# Altium PCB PCB2.PcbDoc (part 1 of 2)
Units mil, origin at the board's own origin, x right, y up, seen from the top; angles counter-clockwise.
Board outline 3543.02 x 3779.37 mil, 2 copper layers (Top Layer, Bottom Layer), stack 62.206 mil thick; 106 components, 60 nets, 312 pads, 222 vias.
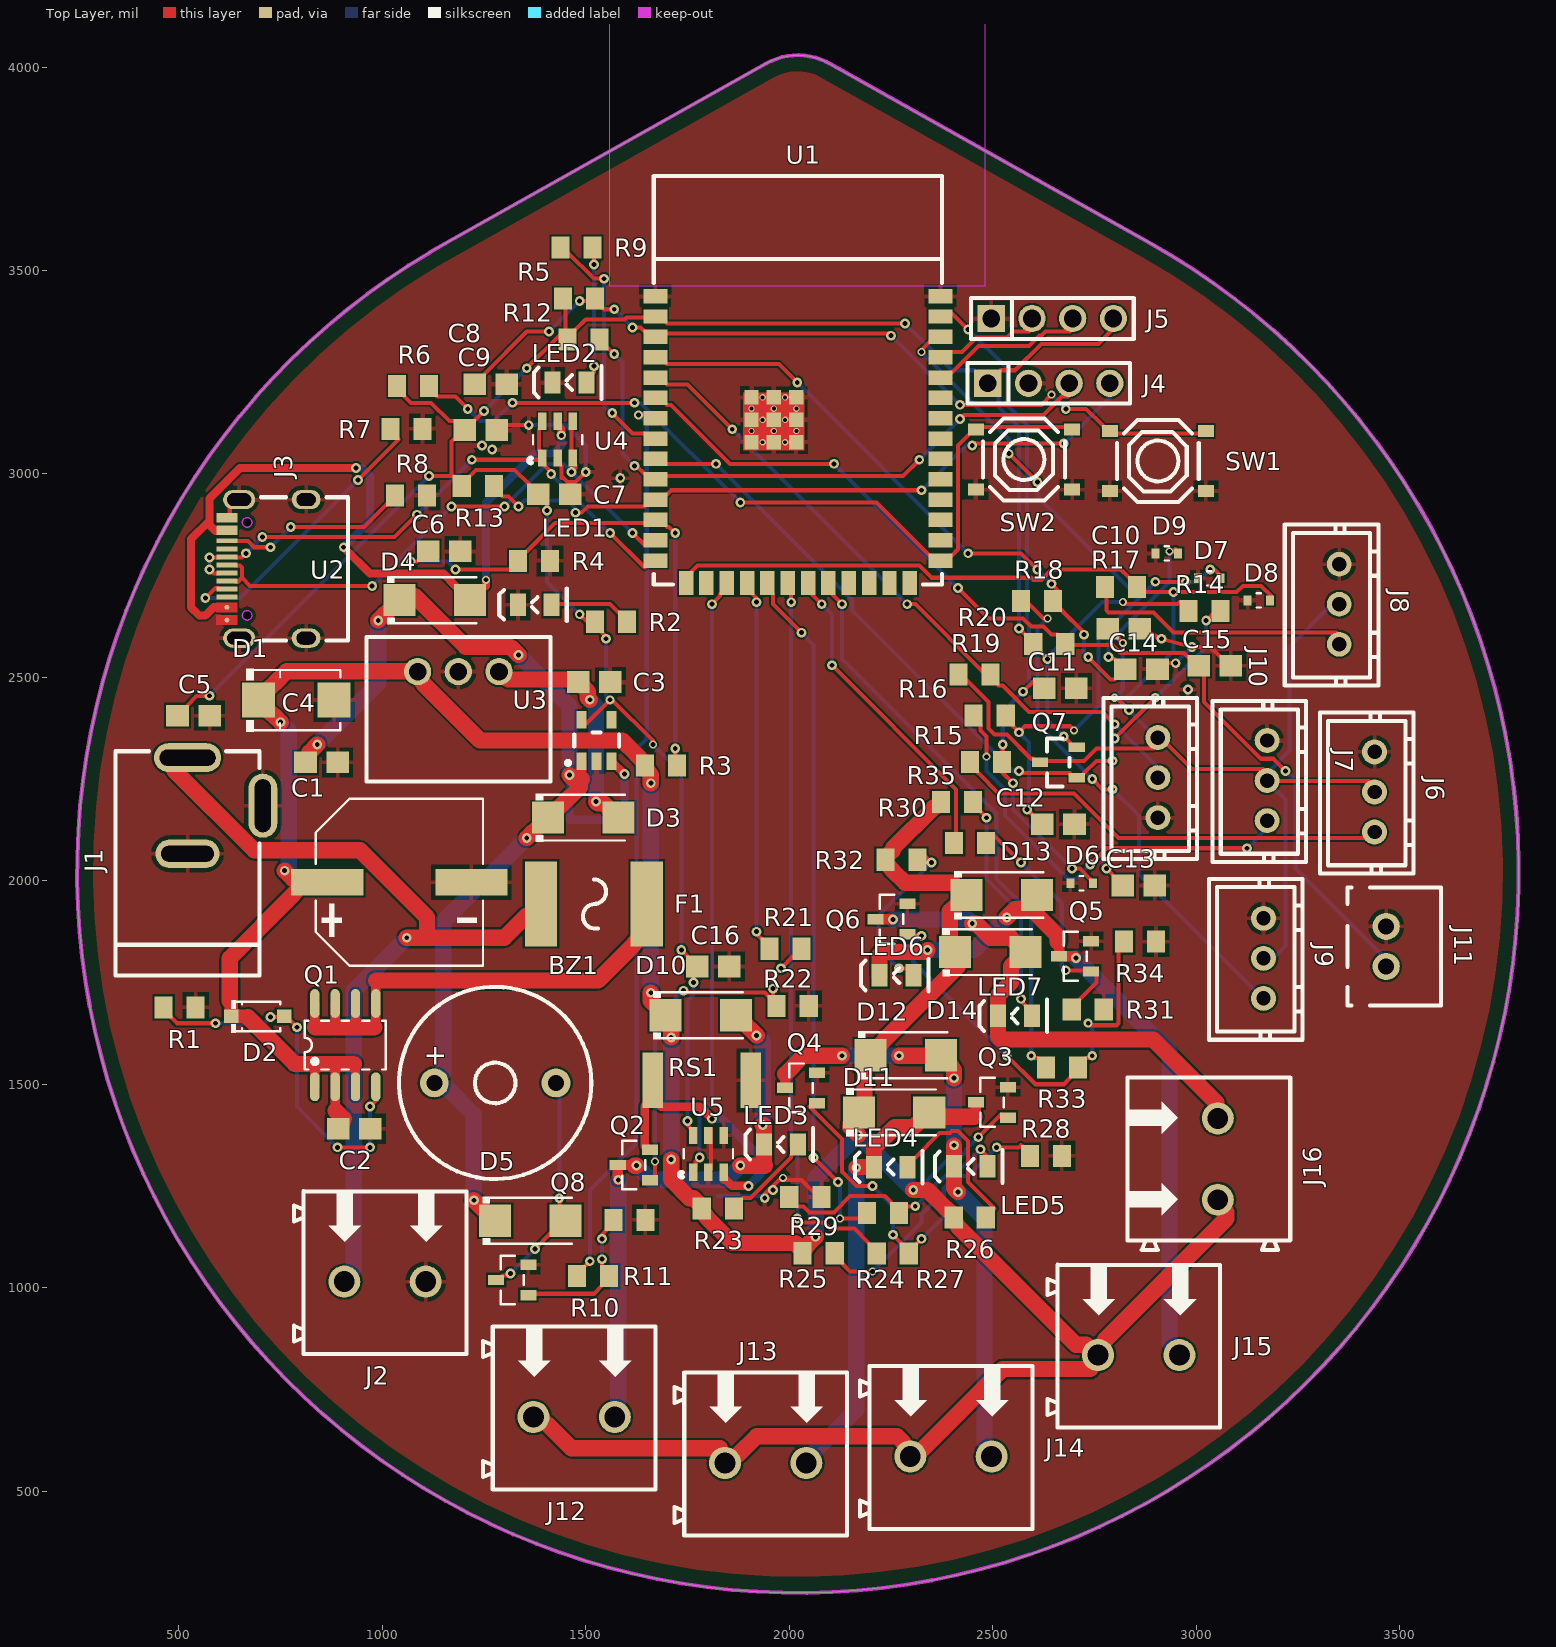
[diagram p0: Top Layer view]
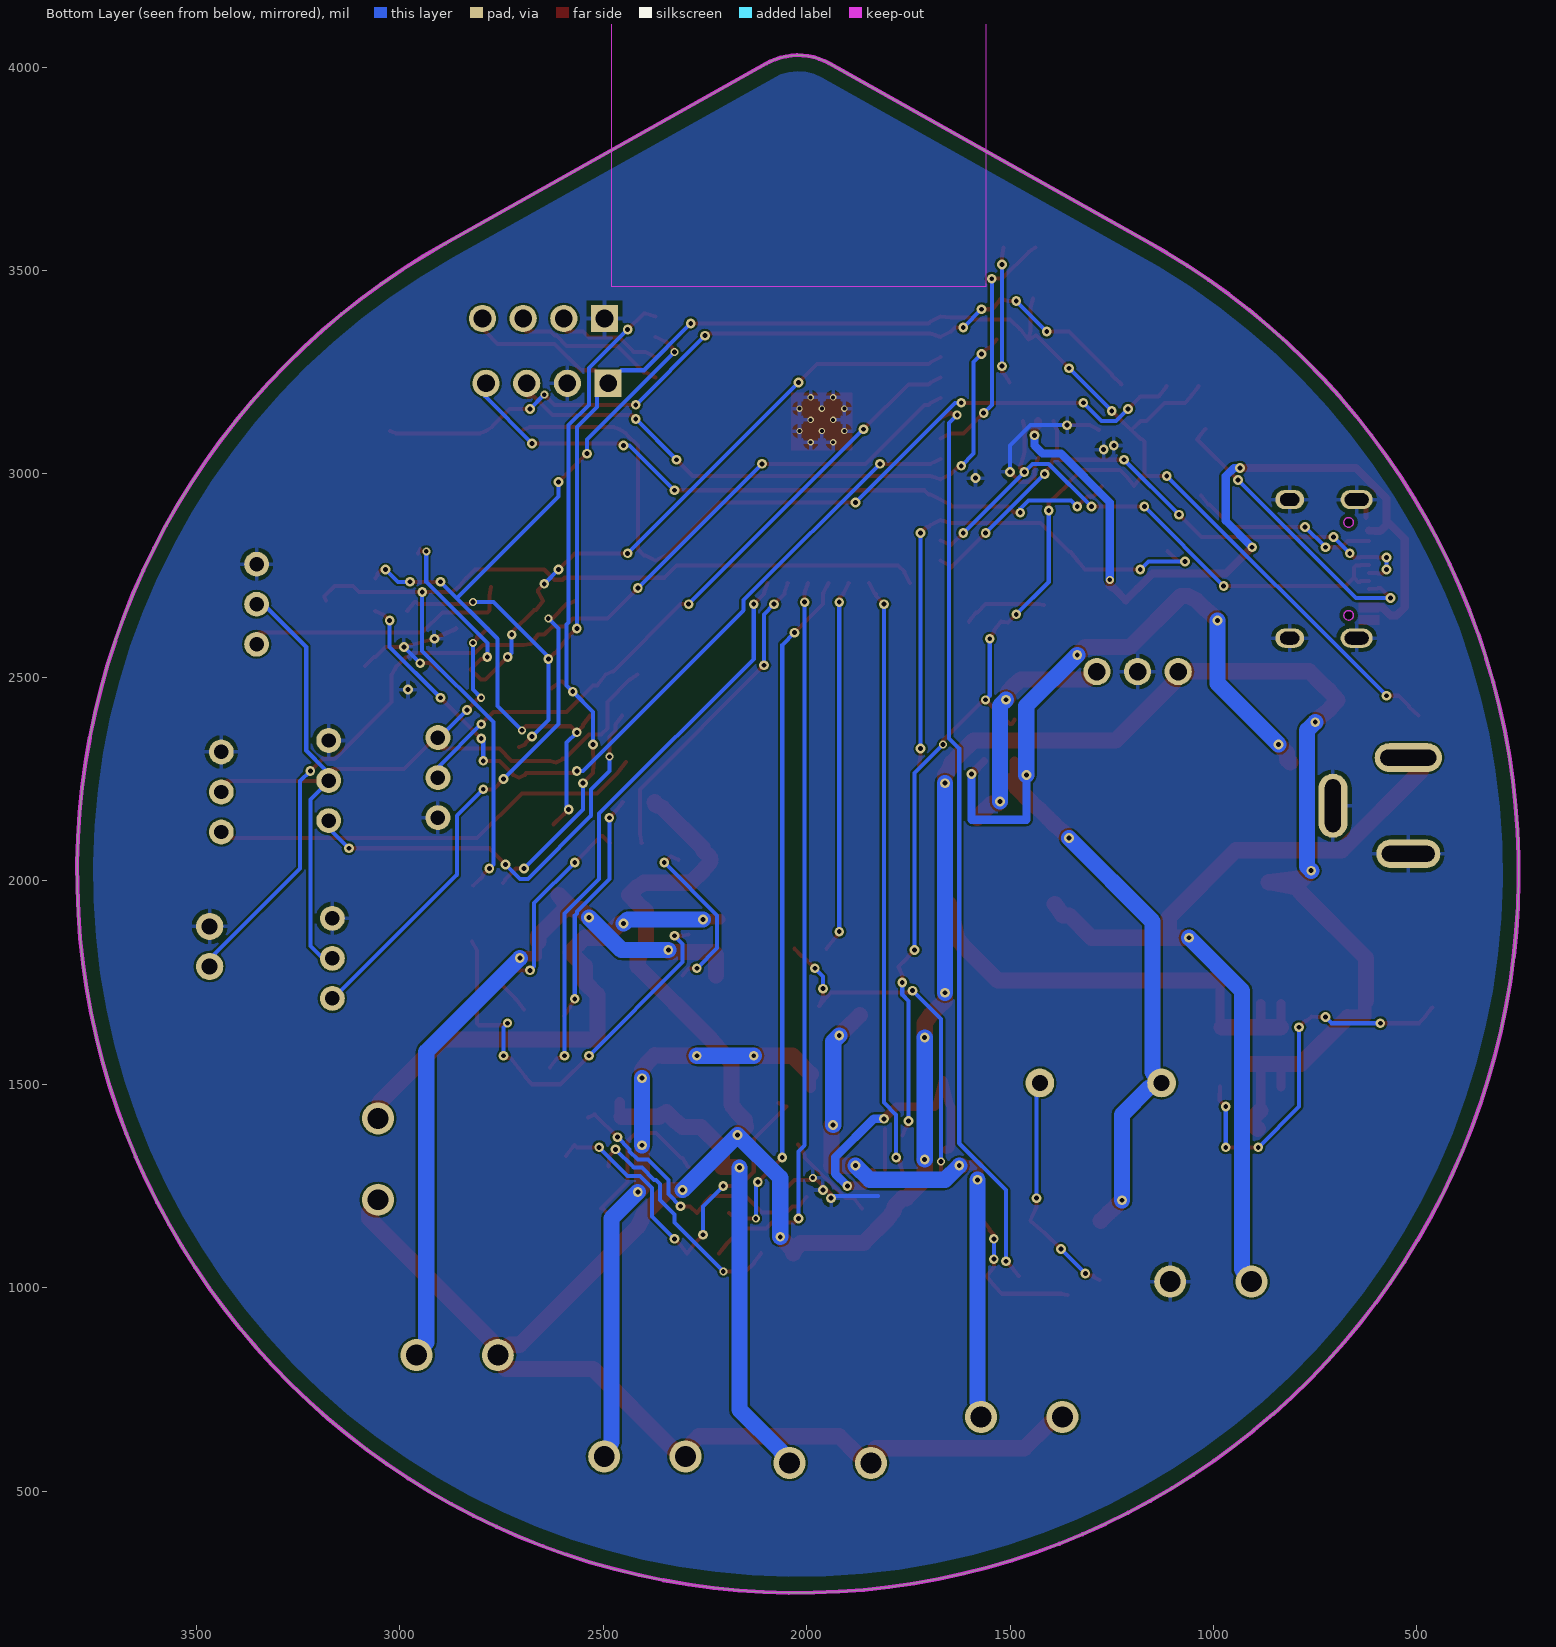
[diagram p1: Bottom Layer view, seen from below]

## Layer stack, top to bottom
Top Solder Mask Layer: solder mask 0.394, Dk 3.3
Top Layer: signal copper 1.379
Dielectric1: surface 59.449, FR4, Dk 4.5
Bottom Layer: signal copper 1.378
Bottom Solder Mask Layer: solder mask 0.394, Dk 3.3

## Board outline
2887.67,3567 2941.08,3535.83 2993.37,3502.81 3044.47,3467.99 3094.33,3431.41 3142.88,3393.11 3190.07,3353.14 3235.83,3311.55 3280.11,3268.38 3322.86,3223.7 3364.02,3177.55 3403.55,3129.99 3441.39,3081.08 3477.51,3030.88 3511.85,2979.46 3544.37,2926.86 3575.04,2873.16 3603.81,2818.43 3630.66,2762.72 3655.55,2706.11 3678.45,2648.66 3699.32,2590.46 3718.16,2531.55 3734.92,2472.03 3749.6,2411.96 3762.18,2351.41 3772.63,2290.46 3780.95,2229.19 3787.13,2167.66 3791.15,2105.95 3793.02,2044.14 3792.73,1982.3 3790.28,1920.51 3785.68,1858.84 3778.93,1797.37 3770.04,1736.17 3759.01,1675.32 3745.87,1614.9 3730.63,1554.97 3713.31,1495.6 3693.92,1436.88 3672.5,1378.87 3649.07,1321.64 3623.65,1265.27 3596.28,1209.81 3567,1155.35 3535.83,1101.94 3502.81,1049.65 3467.99,998.55 3431.41,948.69 3393.11,900.14 3353.14,852.95 3311.55,807.19 3268.38,762.91 3223.7,720.16 3177.55,679 3129.99,639.47 3081.08,601.63 3030.88,565.51 2979.46,531.17 2926.86,498.65 2873.16,467.98 2818.43,439.21 2762.72,412.36 2706.11,387.47 2648.66,364.57 2590.46,343.7 2531.55,324.86 2472.03,308.1 2411.96,293.42 2351.41,280.84 2290.46,270.39 2229.19,262.07 2167.66,255.89 2105.95,251.87 2044.14,250 1982.3,250.29 1920.51,252.74 1858.84,257.34 1797.37,264.09 1736.17,272.98 1675.32,284.01 1614.9,297.15 1554.97,312.39 1495.6,329.71 1436.88,349.1 1378.87,370.52 1321.64,393.95 1265.27,419.37 1209.81,446.74 1155.35,476.02 1101.94,507.19 1049.65,540.21 998.55,575.03 948.69,611.61 900.14,649.91 852.95,689.88 807.19,731.47 762.91,774.64 720.16,819.32 679,865.47 639.47,913.03 601.63,961.94 565.51,1012.14 531.17,1063.56 498.65,1116.16 467.98,1169.86 439.21,1224.59 412.36,1280.3 387.47,1336.91 364.57,1394.36 343.7,1452.56 324.86,1511.47 308.1,1570.99 293.42,1631.06 280.84,1691.61 270.39,1752.56 262.07,1813.83 255.89,1875.36 251.87,1937.07 250,1998.88 250.29,2060.72 252.74,2122.51 257.34,2184.18 264.09,2245.65 272.98,2306.85 284.01,2367.7 297.15,2428.12 312.39,2488.05 329.71,2547.42 349.1,2606.14 370.52,2664.15 393.95,2721.38 419.37,2777.75 446.74,2833.21 476.02,2887.67 507.19,2941.08 540.21,2993.37 575.03,3044.47 611.61,3094.33 649.91,3142.88 689.88,3190.07 731.47,3235.83 774.64,3280.11 819.32,3322.86 865.47,3364.02 913.03,3403.55 961.94,3441.39 1012.14,3477.51 1063.56,3511.85 1116.16,3544.37 1155.35,3567 1944.52,4009.28 1956.78,4015.47 1969.54,4020.56 1982.7,4024.53 1996.15,4027.33 2009.79,4028.95 2023.52,4029.37 2037.24,4028.6 2050.83,4026.63 2064.21,4023.49 2077.26,4019.19 2089.88,4013.77

## Design rules (kind name [scope] priority, off if disabled: settings)
BoardOutlineClearance copperThickness2oz_1 [All] p1 off: gap=7.99 ignorepadtopadclearanceinfootprint=FALSE except(0: Arc-SplitContinuation Track-SplitContinuation SMDPad-SplitContinuation THPad-SplitContinuation Via-SplitContinuation Fill-SplitContinuation Poly-SplitContinuation Region-SplitContinuation Text-SplitContinuation Hole-SplitContinuation; 5.98: Arc-CutoutEdge SMDPad-CutoutEdge THPad-CutoutEdge Via-CutoutEdge Fill-CutoutEdge Region-CutoutEdge Text-CutoutEdge; 6.93: Hole-OutlineEdge Hole-CutoutEdge; 10: Poly-OutlineEdge Poly-CutoutEdge; 11.81: Arc-OutlineEdge Track-OutlineEdge Track-CutoutEdge SMDPad-OutlineEdge THPad-OutlineEdge Via-OutlineEdge Fill-OutlineEdge Region-OutlineEdge Text-OutlineEdge)
BoardOutlineClearance copperThickness1oz_1 [All] p2: gap=4.02 ignorepadtopadclearanceinfootprint=FALSE except(0: Arc-SplitContinuation Track-SplitContinuation SMDPad-SplitContinuation THPad-SplitContinuation Via-SplitContinuation Fill-SplitContinuation Poly-SplitContinuation Region-SplitContinuation Text-SplitContinuation Hole-SplitContinuation; 6: SMDPad-CutoutEdge THPad-CutoutEdge Via-CutoutEdge Fill-CutoutEdge Region-CutoutEdge Text-CutoutEdge; 6.93: Hole-OutlineEdge Hole-CutoutEdge; 10: Poly-OutlineEdge Poly-CutoutEdge; 11.8: Arc-OutlineEdge Track-OutlineEdge SMDPad-OutlineEdge THPad-OutlineEdge Via-OutlineEdge Fill-OutlineEdge Region-OutlineEdge Text-OutlineEdge; 11.81: Arc-CutoutEdge Track-CutoutEdge)
Clearance ClearanceU1_ThermalVias [InComponent('U1') vs InComponent('U1')] p1: gap=4 ignorepadtopadclearanceinfootprint=TRUE
Clearance J3_Slot_Clearance [InComponent('J3') vs IsBoardCutoutRegion] p2: gap=0 ignorepadtopadclearanceinfootprint=FALSE
Clearance copperThickness2oz [All] p3 off: gap=5.98 ignorepadtopadclearanceinfootprint=FALSE except(6.93: Arc-Hole Track-Hole SMDPad-Hole THPad-Hole Via-Hole Fill-Hole Region-Hole Text-Hole; 7.99: Track-Track; 10: Arc-Poly Track-Poly SMDPad-Poly THPad-Poly Via-Poly Fill-Poly Poly-Poly Poly-Region Poly-Text Poly-Hole)
Clearance copperThickness1oz [All] p4: gap=5 ignorepadtopadclearanceinfootprint=TRUE
Creepage creepage [All] p1: checkdistance=0 applytopolygonpour=TRUE
DiffPairsRouting differentialPair [All] p1: maxlimit=6 minlimit=6 mostfreqgap=6 toplayer_minwidth=5 toplayer_maxwidth=100 toplayer_prefwidth=10 bottomlayer_minwidth=5 bottomlayer_maxwidth=100 bottomlayer_prefwidth=10 maxuncoupledlength=10
HoleSize [All] p1: absolutevalues=TRUE maxlimit=250 minlimit=1 maxpercent=80.000 minpercent=20.000
HoleToHoleClearance otherClearance [All] p1: gap=11.81 allowstackedmicrovias=TRUE
Length netLength [All] p1 off: maxlimit=0 minlimit=0
MatchedLengths netLengthTolerance [All] p1 off: tolerance=1000 checknetsindiffpair=FALSE checkdiffpairvsdiffpair=TRUE checkxsignals=TRUE checkothers=TRUE
MinimumSolderMaskSliver [All] p1: minsoldermaskwidth=0
PasteMaskExpansion pasteMaskExpansion [All] p1: expansion=0
PlaneConnect innerPlane [All] p1: planeconnectstyle=Relief reliefexpansion=20 reliefentries=4 reliefconductorwidth=10 reliefairgap=10
PolygonConnect copperRegion [All] p1: connectstyle=Relief reliefconductorwidth=10 reliefentries=4 polygonreliefangle="90 Angle" airgapwidth=10
RoutingVias viaSize [All] p1: holewidth=12.01 width=24.02 viastyle="Through Hole" minholewidth=11.81 minwidth=19.68 maxholewidth=248.03 maxwidth=393.7
SilkToSilkClearance [All] p1: silktosilkclearance=6
SilkToSolderMaskClearance [IsPad] p1: minsilkscreentomaskgap=6 clearancetoexposedcopper=TRUE
SolderMaskExpansion solderMaskExpansion_1 [IsVia] p1: expansion=-1000 istentingtop=TRUE
SolderMaskExpansion solderMaskExpansion [All] p2: expansion=2 istentingtop=FALSE
Width PowerWidth [InNetClass('POWER')] p1: maxlimit=100 minlimit=20 preferedwidth=40 minimp=50.000000 maximp=50.000000 favimp=50.000000
Width copperThickness2oz_2 [All] p2 off: maxlimit=100 minlimit=8 preferedwidth=10
Width power [(InNet('+5V') OR InNet('GND') OR InNet('+12V') OR InNet('+5V_REG') OR InNet('VBUS') OR InNet('OUT_PUMP') OR InNet('OUT_V1') OR InNet('OUT_V2') OR InNet('OUT_V3') OR InNet('OUT_V4') OR InNet('VIN_RAW') OR InNet('VIN_F') OR InNet('PUMP_SRC'))] p3 off: maxlimit=100 minlimit=23.6 preferedwidth=39.4
Width copperThickness1oz_2 [All] p4: maxlimit=100 minlimit=5 preferedwidth=10
22 further rules are at their usual default settings.

## Classes and differential pairs
net class POWER: +5V +5V_REG +12V OUT_PUMP OUT_V1 OUT_V2 OUT_V3 OUT_V4 PUMP_SRC VBUS VIN_F VIN_RAW

## Components (designator, comment, footprint, x,y, rotation, side; value= is the part's Value field where it differs from the comment)
BZ1 "2.4kHz" BUZ-TH_BD12.0-P7.60-D0.6-FD 1277.3,1503.2 r0 top
C1 "470uF" CAP-SMD_BD10.0-L10.3-W10.3-LS11.0-FD 1041.71,1996.53 r0 top
C2 "10uF" C0805 930.69,1390.4 r0 top
C3 "10uF" C0805 1520.88,2488.66 r0 top
C4 "1uF" C0805 850.54,2291.1 r0 top
C5 "10uF" C0805 535.99,2406.18 r0 top
C6 "100nF" C0805 1152.07,2810.16 r0 top
C7 "10uF" C0805 1422.6,2949.81 r0 top
C8 "100nF" C0805 1241.57,3108.09 r0 top
C9 "1uF" C0805 1266.07,3220.66 r0 top
C10 "100nF" C0805 2822.49,2619.99 r0 top
C11 "100nF" C0805 2666.65,2473.12 r0 top
C12 "100nF" C0805 2661.86,2139.08 r0 top
C13 "100nF" C0805 2858.89,1988.44 r0 top
C14 "100nF" C0805 2865.92,2519.62 r0 top
C15 "100nF" C0805 3046.42,2528.3 r0 top
C16 "100nF" C0805 1813.85,1789.4 r0 top
D1 "SMBJ15A" SMB_L4.6-W3.6-LS5.3-RD 788.43,2444 r0 top
D2 "BZT52C12-WH-SOD-123" SOD-123_L2.7-W1.7-LS3.8-RD 693.36,1666.64 r0 top
D3 "SS14 SMA" SMA_L4.3-W2.6-LS5.1-RD 1494.25,2155.26 r0 top
D4 "SS14 SMA" SMA_L4.3-W2.6-LS5.1-RD 1129.05,2689.77 r0 top
D5 "SS14 SMA" SMA_L4.3-W2.6-LS5.1-RD 1363.72,1164.5 r0 top
D6 "ESD5Z3.3T1G" SOD-523_L1.2-W0.8-LS1.6-FD 2718.81,1994.42 r0 top
D7 "ESD5Z3.3T1G" SOD-523_L1.2-W0.8-LS1.6-FD 3032.62,2743.29 r0 top
D8 "ESD5Z3.3T1G" SOD-523_L1.2-W0.8-LS1.6-FD 3154.29,2689.09 r0 top
D9 "ESD5Z3.3T1G" SOD-523_L1.2-W0.8-LS1.6-FD 2928.15,2804.64 r0 top
D10 "SS34" SMA_L4.3-W2.6-LS5.2-RD 1783.17,1669.61 r0 top
D11 "SS34" SMA_L4.3-W2.6-LS5.2-RD 2257.73,1430.96 r0 top
D12 "SS34" SMA_L4.3-W2.6-LS5.2-RD 2286.7,1571.31 r0 top
D13 "SS34" SMA_L4.3-W2.6-LS5.2-RD 2522.92,1965.01 r0 top
D14 "SS34" SMA_L4.3-W2.6-LS5.2-RD 2493.95,1824.66 r0 top
F1 "BSMD2920-400-24V" F2920 1520.03,1943.17 r0 top
J1 "DC-005-5A-2.0" DC-IN-TH_DC-005-5A-2.0 613.82,2184.64 r90 top
J2 "WJ500V-5.08-2P" CONN-TH_2P-P5.00_WJ500V-5.08-2P 1006.51,1014.9 r0 top
J3 "TYPE-C-31-M-12" USB-C_SMD-TYPE-C-31-M-12_1 715.31,2766.8 r90 top
J4 "PZ254V-11-04P" HDR-TH_4P-P2.54-V-M 2638.17,3222.93 r0 top
J5 "PZ254V-11-04P" HDR-TH_4P-P2.54-V-M 2646.92,3382.26 r0 top
J6 "B3B-XH-A(LF)(SN)" CONN-TH_3P-P2.50_A2501WV2-3P 3438.83,2218.36 r270 top
J7 "B3B-XH-A(LF)(SN)" CONN-TH_3P-P2.50_A2501WV2-3P 3174.76,2246.51 r270 top
J8 "B3B-XH-A(LF)(SN)" CONN-TH_3P-P2.50_A2501WV2-3P 3352.06,2679.83 r270 top
J9 "B3B-XH-A(LF)(SN)" CONN-TH_3P-P2.50_A2501WV2-3P 3165.88,1809.34 r270 top
J10 "B3B-XH-A(LF)(SN)" CONN-TH_3P-P2.50_A2501WV2-3P 2906.33,2253.74 r270 top
J11 "B2B-XH-A(LF)(SN)" CONN-TH_B2B-XH-A-LF-SN 3467.45,1838.75 r270 top
J12 "WJ500V-5.08-2P" CONN-TH_2P-P5.00_WJ500V-5.08-2P 1471.36,682.24 r0 top
J13 "WJ500V-5.08-2P" CONN-TH_2P-P5.00_WJ500V-5.08-2P 1942.19,569.15 r0 top
J14 "WJ500V-5.08-2P" CONN-TH_2P-P5.00_WJ500V-5.08-2P 2397.67,585.05 r0 top
J15 "WJ500V-5.08-2P" CONN-TH_2P-P5.00_WJ500V-5.08-2P 2859.1,834.3 r0 top
J16 "WJ500V-5.08-2P" CONN-TH_2P-P5.00_WJ500V-5.08-2P 3053.58,1316.11 r90 top
LED1 "KT-0805G" LED0805-R-RD 1374.9,2678.51 r0 top
LED2 "KT-0805G" LED0805-R-RD 1459.93,3224.85 r0 top
LED3 "KT-0805G" LED0805-R-RD 1979.89,1351.88 r0 top
LED4 "KT-0805G" LED0805-R-RD 2249.38,1296.26 r0 top
LED5 "KT-0805G" LED0805-R-RD 2445.92,1298.02 r0 top
LED6 "KT-0805G" LED0805-R-RD 2263.9,1767.54 r0 top
LED7 "KT-0805G" LED0805-R-RD 2555.03,1667.95 r0 top
Q1 "AO4407A" SOIC-8_L4.9-W3.9-P1.27-LS6.0-BL 909.03,1596.16 r0 top
Q2 "AO3400A" SOT-23-3_L2.9-W1.3-P1.90-LS2.4-BR 1618.02,1301.56 r0 top
Q3 "AO3400A" SOT-23-3_L2.9-W1.3-P1.90-LS2.4-BR 2498.37,1455.54 r0 top
Q4 "AO3400A" SOT-23-3_L2.9-W1.3-P1.90-LS2.4-BR 2029.25,1490.92 r0 top
Q5 "AO3400A" SOT-23-3_L2.9-W1.3-P1.90-LS2.4-BR 2702.96,1814.48 r0 top
Q6 "AO3400A" SOT-23-3_L2.9-W1.3-P1.90-LS2.4-BR 2251.28,1905.89 r0 top
Q7 "AO3401A" SOT-23_L2.9-W1.3-P1.90-LS2.4-BR 2661.57,2291.1 r0 top
Q8 "AO3400A" SOT-23-3_L2.9-W1.3-P1.90-LS2.4-BR 1319.33,1018.89 r0 top
R1 "10kΩ" R0805 501.78,1689.04 r0 top
R2 "1kΩ" R0805 1562.06,2636.85 r0 top
R3 "100kΩ" R0805 1684.81,2283.67 r0 top
R4 "22kΩ" R0805 1372.72,2786.37 r0 top
R5 "10kΩ" R0805 1483.48,3431.03 r0 top
R6 "10kΩ" R0805 1075.78,3215.75 r0 top
R7 "5.1kΩ" R0805 1059.43,3110.84 r0 top
R8 "5.1kΩ" R0805 1070.33,2947.59 r0 top
R9 "1kΩ" R0805 1477.06,3556.74 r0 top
R10 "100Ω" R0805 1517.95,1028.33 r0 top
R11 "100kΩ" R0805 1607.37,1166.65 r0 top
R12 "4.7kΩ" R0805 1494.25,3330.1 r0 top
R13 "4.7kΩ" R0805 1234.69,2970.41 r0 top
R14 "100kΩ" R0805 3021.13,2663.28 r0 top
R15 "1kΩ" R0805 2483.78,2291.73 r0 top
R16 "1kΩ" R0805 2492.86,2406.32 r0 top
R17 "1kΩ" R0805 2815.39,2722.74 r0 top
R18 "1kΩ" R0805 2608.85,2688.04 r0 top
R19 "4.7kΩ" R0805 2455.19,2506.7 r0 top
R20 "10kΩ" R0805 2639.22,2582.18 r0 top
R21 "100Ω" R0805 1990.91,1833.09 r0 top
R22 "100kΩ" R0805 2008.66,1692.5 r0 top
R23 "10kΩ" R0805 1824.59,1194.12 r0 top
R24 "100Ω" R0805 2230.24,1183.48 r0 top
R25 "100kΩ" R0805 2039.69,1223.27 r0 top
R26 "10kΩ" R0805 2443.88,1172.36 r0 top
R27 "100Ω" R0805 2254.66,1083.82 r0 top
R28 "100kΩ" R0805 2630.99,1324.13 r0 top
R29 "10kΩ" R0805 2072.52,1084.66 r0 top
R30 "100Ω" R0805 2444.74,2092.95 r0 top
R31 "100kΩ" R0805 2734.01,1683.69 r0 top
R32 "10kΩ" R0805 2275.72,2051.76 r0 top
R33 "100Ω" R0805 2670.4,1541.68 r0 top
R34 "100kΩ" R0805 2862.35,1850.79 r0 top
R35 "10kΩ" R0805 2412.71,2193.44 r0 top
RS1 "20mΩ" R2512 1785.29,1509.7 r0 top
SW1 "TS-1187A-B-A-B" SW-SMD_4P-L5.1-W5.1-P3.70-LS6.5-TL_H1.5 2906.27,3031.95 r0 top
SW2 "TS-1187A-B-A-B" SW-SMD_4P-L5.1-W5.1-P3.70-LS6.5-TL_H1.5 2577.26,3035.58 r0 top
U1 "2.4GHz" WIFIM-SMD_ESP32-S3-WROOM-1-N8 2021.51,3084.5 r0 top
U2 "K7805-1000R3" PWRM-TH_K78XX-2000 1186.69,2514.3 r0 top
U3 "AP2112K-3.3TRG1" SOT-25-5_L2.9-W1.6-P0.95-LS2.8-BL 1526.41,2345.06 r0 top
U4 "USBLC6-2SC6" SOT-23-6_L2.9-W1.6-P0.95-LS2.8-BL 1430.96,3084.5 r0 top
U5 "INA181A2IDBVR" SOT-23-6_L2.9-W1.6-P0.95-LS2.8-BL 1801.33,1328.92 r0 top

## Footprints (in the part's own frame and the unit in brackets; to place one, negate y for a bottom-side part, rotate by r counter-clockwise, add the part's x,y. Pads: shape width x height; smd on the part's side, far side on the other; paste and mask are expansions set on the pad)
BUZ-TH_BD12.0-P7.60-D0.6-FD [mm]
  round 1.8 hole 1: 1(-3.8,0) 2(3.8,0)
  silkscreen extent -6,-6 6,6
C0805 [mm]
  rect 1.41x1.35 smd paste-100 mask+0.051: 1(-1,0) 2(1,0)
CAP-SMD_BD10.0-L10.3-W10.3-LS11.0-FD [mm]
  rect 4.5x1.65 smd: 1(-4.5,0) 2(4.5,0)
  silkscreen extent -5.23,-5.23 5.23,5.23
CONN-TH_2P-P5.00_WJ500V-5.08-2P [mm]
  round 2 hole 1.3: 1(-2.54,0) 2(2.54,0)
  silkscreen extent -5.68,-4.52 5.08,5.64
CONN-TH_3P-P2.50_A2501WV2-3P [mm]
  round 1.55 hole 0.9: 1(-2.5,0) 2(0,0) 3(2.5,0)
  silkscreen extent -4.97,-3.4 5.08,2.44
CONN-TH_B2B-XH-A-LF-SN [mm]
  round 1.7 hole 1: 1(1.25,0) 2(-1.25,0)
  silkscreen extent -3.68,-2.41 3.68,3.43
DC-IN-TH_DC-005-5A-2.0 [mm]
  oval 1.8x4.2 hole 1 slot 3.5 at 90 deg: 1(3,2.352)
  oval 1.8x4 hole 1 slot 3.3 at 90 deg: 2(-3,2.352)
  oval 4x1.8 hole 1 slot 3.3 at 0 deg: 3(0,-2.352)
  silkscreen extent -10.6,-2.15 3.4,6.85
F2920 [mm]
  rect 2x5.3 smd: 1(-3.3,0) 2(3.3,0)
  silkscreen extent -0.69,-1.54 0.76,1.52
HDR-TH_4P-P2.54-V-M [mm]
  rect 1.7x1.7 hole 1.1: 1(-3.81,0)
  round 1.7 hole 1.1: 2(-1.27,0) 3(1.27,0) 4(3.81,0)
  silkscreen extent -5.08,-1.27 5.08,1.27
LED0805-R-RD [mm]
  rect 1x1.4 smd: 1(1.05,0) 2(-1.05,0)
  silkscreen extent -2.22,-1.02 1.99,1.01
PWRM-TH_K78XX-2000 [mm]
  round 1.7 hole 1.1: 1(-2.54,0) 2(0,0) 3(2.54,0)
  silkscreen extent -5.74,-6.86 5.77,2.16
R0805 [mm]
  rect 1.133x1.377 smd paste-100 mask+0.051: 1(-1,0) 2(1,0)
R2512 [mil]
  rect 50.49x136.06 smd paste-3937.01 mask+2: 1(-120.72,0) 2(120.72,0)
SMA_L4.3-W2.6-LS5.1-RD [mm]
  rect 2x2 smd: 1(-2.2,0) 2(2.2,0)
  silkscreen extent -2.98,-1.5 2.6,1.5
SMA_L4.3-W2.6-LS5.2-RD [mm]
  rect 2x2 smd: 1(-2.2,0) 2(2.2,0)
  silkscreen extent -2.98,-1.5 2.6,1.5
SMB_L4.6-W3.6-LS5.3-RD [mil]
  rect 80.61x86.31 smd: 1(-92.94,0) 2(92.94,0)
  silkscreen extent -123,-77 108,77
SOD-123_L2.7-W1.7-LS3.8-RD [mm]
  rect 0.91x0.84 smd: 1(-1.655,0) 2(1.655,0)
  silkscreen extent -1.65,-1 1.43,1
SOD-523_L1.2-W0.8-LS1.6-FD [mm]
  rect 0.5x0.6 smd: 1(-0.7,0) 2(0.7,0)
  silkscreen extent -0.13,-0.45 0.13,0.45
SOIC-8_L4.9-W3.9-P1.27-LS6.0-BL [mm]
  oval 0.588x1.8 smd paste+0 mask+0.051: 1(-1.905,-2.6) 2(-0.635,-2.6) 3(0.635,-2.6) 4(1.905,-2.6) 5(1.905,2.6) 6(0.635,2.6) 7(-0.635,2.6) 8(-1.905,2.6)
  silkscreen extent -2.53,-1.52 2.53,1.52
SOT-23-3_L2.9-W1.3-P1.90-LS2.4-BR [mm]
  rect 1x0.65 smd: 1(1,-0.95) 2(1,0.95) 3(-1,0)
  silkscreen extent -0.73,-1.53 0.73,1.53
SOT-23-6_L2.9-W1.6-P0.95-LS2.8-BL [mil]
  rect 20.95x42.2 smd: 1(-37.4,-45.24) 2(0,-45.24) 3(37.4,-45.24) 4(37.4,45.24) 5(0,45.24) 6(-37.4,45.24)
  silkscreen extent -72,-57 61,11
SOT-23_L2.9-W1.3-P1.90-LS2.4-BR [mm]
  rect 1x0.6 smd paste+0 mask+0.051: 1(1.15,-0.95) 2(1.15,0.95) 3(-1.15,0)
  silkscreen extent -0.7,-1.5 0.7,1.5
SOT-25-5_L2.9-W1.6-P0.95-LS2.8-BL [mil]
  rect 24.5x43.5 smd: 1(-37.39,-51.18) 2(-0.02,-51.18) 3(37.39,-51.18) 4(37.39,51.18) 5(-37.39,51.18)
  silkscreen extent -75,-60 56,20
SW-SMD_4P-L5.1-W5.1-P3.70-LS6.5-TL_H1.5 [mm]
  rect 1x0.75 smd: 1(-3,1.875) 2(3,1.875) 3(-3,-1.875) 4(3,-1.875)
  silkscreen extent -2.55,-2.55 2.55,2.55
USB-C_SMD-TYPE-C-31-M-12_1 [mm]
  oval 1.2x2 hole 0.8 slot 1.5 at 90 deg paste-2539.97 mask+0.051: 1(4.325,1.706) 4(-4.325,1.706)
  oval 1.2x1.8 hole 0.8 slot 1.2 at 90 deg copper offset 0,0 paste-2539.97 mask+0.051: 2(4.325,-2.474) 3(-4.325,-2.474)
  round 0.3 smd: A1B12(-3.2,2.474) A4B9(-2.4,2.474)
  rect 0.3x1.3 smd paste-100 mask+0.051: A5(-1.25,2.474) A6(-0.25,2.474) A7(0.25,2.474) A8(1.25,2.474) B5(1.75,2.474) B6(0.75,2.474) B7(-0.75,2.474) B8(-1.75,2.474)
  rect 0.6x1.3 smd paste-100 mask+0.051: B1A12(3.2,2.474) B4A9(2.4,2.474)
  Top Layer region: -2.9,1.824 -2.9,3.124 -3.2,3.124 -3.2,3.124 -3.5,3.124 -3.5,1.824 -3.2,1.824 -3.2,1.824 -2.9,1.824
  Top Layer region: -2.1,1.824 -2.1,3.124 -2.4,3.124 -2.4,3.124 -2.7,3.124 -2.7,1.824 -2.4,1.824 -2.4,1.824 -2.1,1.824
  Board Outline Layer board cut-out: 2.9,0.906 2.77,0.935 2.665,1.019 2.607,1.139 2.607,1.272 2.665,1.393 2.77,1.476 2.9,1.506 2.9,1.506 3.03,1.476 3.134,1.393 3.192,1.272 3.192,1.139 3.134,1.019 3.03,0.935 2.9,0.906 2.9,0.906
  Board Outline Layer board cut-out: -2.9,0.906 -3.03,0.935 -3.134,1.019 -3.192,1.139 -3.192,1.272 -3.134,1.393 -3.03,1.476 -2.9,1.506 -2.9,1.506 -2.77,1.476 -2.665,1.393 -2.607,1.272 -2.607,1.139 -2.665,1.019 -2.77,0.935 -2.9,0.906 -2.9,0.906
  Board Outline Layer circle w0.003: c2.9,1.206 r0.3
  Board Outline Layer circle w0.003: c-2.9,1.206 r0.3
  Board Outline Layer region: 2.9,0.906 2.828,0.914 2.761,0.94 2.701,0.981 2.653,1.035 2.619,1.099 2.602,1.169 2.602,1.242 2.619,1.312 2.653,1.376 2.701,1.43 2.761,1.471 2.828,1.497 2.9,1.506 2.972,1.497 3.039,1.471 3.099,1.43 3.147,1.376 3.18,1.312 3.198,1.242 3.198,1.169 3.18,1.099 3.147,1.035 3.099,0.981 3.039,0.94 2.972,0.914 2.9,0.906
  Board Outline Layer region: -2.9,0.906 -2.972,0.914 -3.039,0.94 -3.099,0.981 -3.147,1.035 -3.18,1.099 -3.198,1.169 -3.198,1.242 -3.18,1.312 -3.147,1.376 -3.099,1.43 -3.039,1.471 -2.972,1.497 -2.9,1.506 -2.828,1.497 -2.761,1.471 -2.701,1.43 -2.653,1.376 -2.619,1.312 -2.602,1.242 -2.602,1.169 -2.619,1.099 -2.653,1.035 -2.701,0.981 -2.761,0.94 -2.828,0.914 -2.9,0.906
  Board Outline Layer region: 2.9,0.906 2.77,0.935 2.665,1.019 2.607,1.139 2.607,1.272 2.665,1.393 2.77,1.476 2.9,1.506 2.9,1.506 3.03,1.476 3.134,1.393 3.192,1.272 3.192,1.139 3.134,1.019 3.03,0.935 2.9,0.906 2.9,0.906
  Board Outline Layer region: -2.9,0.906 -3.03,0.935 -3.134,1.019 -3.192,1.139 -3.192,1.272 -3.134,1.393 -3.03,1.476 -2.9,1.506 -2.9,1.506 -2.77,1.476 -2.665,1.393 -2.607,1.272 -2.607,1.139 -2.665,1.019 -2.77,0.935 -2.9,0.906 -2.9,0.906
  silkscreen extent -4.47,-5.09 4.47,0.34
WIFIM-SMD_ESP32-S3-WROOM-1-N8 [mm]
  rect 1.5x0.9 smd paste+0 mask+0.05: 1(-8.9,8.955) 2(-8.9,7.685) 3(-8.9,6.415) 4(-8.9,5.145) 5(-8.9,3.875) 6(-8.9,2.605) 7(-8.9,1.335) 8(-8.9,0.065) 9(-8.9,-1.205) 10(-8.9,-2.475) 11(-8.9,-3.745) 12(-8.9,-5.015) 13(-8.9,-6.285) 14(-8.9,-7.555) 27(8.9,-7.555) 28(8.9,-6.285) 29(8.9,-5.015) 30(8.9,-3.745) 31(8.9,-2.475) 32(8.9,-1.205) 33(8.9,0.065) 34(8.9,1.335) 35(8.9,2.605) 36(8.9,3.875) 37(8.9,5.145) 38(8.9,6.415) 39(8.9,7.685) 40(8.9,8.955)
  rect 0.9x1.5 smd paste+0 mask+0.05: 15(-6.985,-8.955) 16(-5.715,-8.955) 17(-4.445,-8.955) 18(-3.175,-8.955) 19(-1.905,-8.955) 20(-0.635,-8.955) 21(0.635,-8.955) 22(1.905,-8.955) 23(3.175,-8.955) 24(4.445,-8.955) 25(5.715,-8.955) 26(6.985,-8.955)
  rect 0.9x0.9 smd: 41(-2.9,-0.165) 41(-2.9,1.235) 41(-2.9,2.635) 41(-1.499,-0.165) 41(-1.499,1.235) 41(-1.499,2.635) 41(-0.099,-0.165) 41(-0.099,1.235) 41(-0.099,2.635)
  silkscreen extent -9,-9.05 9,16.45

## Via types
v1: diameter 24.02, hole 12.01, Top Layer to Bottom Layer, tented both sides, 192 vias
v2: diameter 19.68, hole 11.81, Top Layer to Bottom Layer, tented both sides, 15 vias
v3: diameter 15.75, hole 9.8, Top Layer to Bottom Layer, tented both sides, 12 vias
v4: diameter 22, hole 12, Top Layer to Bottom Layer, tented both sides, 3 vias

## Nets (pads, with @x,y where several pads share a name; then routed paths per layer and width w, separated by ;. In a path a pad name is that pad's centre, name@x,y a point inside that pad or via, vN(x,y) a via of type N, cw(c..) or ccw(c..) an arc to the next point about the centre after c; other vN are vias at no path point)
+3V3: C5.1 C7.1 C8.1 C16.1 J4.1 J5.4 Q7.2 R2.1 R5.1 R6.1 R12.1 R13.1 R14.1 R20.1 U1.2 U3.5 U5.6 | length 6767.7
  Top Layer w10: C5.1@496.62,2406.18 519.37,2427.75 520,2430 545,2455 v1(575,2455) ; R6.1@1036.41,3215.75 1053.71,3193.64 1055,3190 1070,3175 1120,3175 1165,3130 1175,3130 1179.44,3129.66 C8.1@1202.2,3108.09 ; v1(1115,2995) 1175,2995 1178.03,2992.52 R13.1@1195.32,2970.41 1212.61,2992.52 1215,2995 1230,3010 1325,3010 1360,2975 1360.48,2971.38 C7.1@1383.23,2949.81 1405,2928.23 1405,2925 v1(1405,2910) ; 1170,2995 1170,3080 1175,3085 1179.44,3086.51 C8.1@1202.2,3108.09 ; v1(1250,3155) 1225,3130 1224.95,3129.66 C8.1@1202.2,3108.09 ; v1(1355,3260) 1435,3340 1437.58,3340 R12.1@1454.88,3330.1 ; R5.1@1444.11,3431.03 1450,3408.92 1450,3405 1450,3355 1450,3352.21 R12.1@1454.88,3330.1 ; v1(1485,2655) 1505,2635 1505.4,2635 R2.1@1522.69,2636.85 1539.98,2614.75 1540,2610 1550,2600 v1(1550,2595) ; U3.5@1489.02,2396.24 1496.27,2385 1500,2385 v4(1560,2445) 1565,2445 1665,2345 v2(1665,2335) ; v1(1735,1830) 1750,1815 1751.73,1810.98 C16.1@1774.48,1789.4 1765,1767.83 1765,1765 v1(1765,1750) ; v1(1750,1410) 1750,1400 1755,1395 1758.46,1390.26 U5.6@1763.93,1374.16 ; v1(2285,3370) 1700,3370 1695.65,3374.33 U1.2@1671.13,3387.05 1646.6,3385 1645,3385 1600,3385 1595,3380 1500,3380 1475,3355 1472.17,3352.21 R12.1@1454.88,3330.1 ; J4.1@2488.17,3222.93 2516.63,3251.39 2520,3255 2555,3255 2620,3320 2760,3320 2790,3350 2790.95,3354.43 J5.4@2796.92,3382.26 ; v1(2565,2620) 2580,2605 2582.55,2604.28 R20.1@2599.85,2582.18 2617.14,2560.07 2620,2560 v1(2635,2545) ; v1(2675,2355) 2690,2340 2692.16,2335.31 Q7.2@2706.84,2328.5 ; v2(2820,2685) 2825,2680 2955,2680 2960,2685 2964.46,2685 R14.1@2981.76,2663.28
  Bottom Layer w10: v1(575,2455) v1(1115,2995) ; v1(1250,3155) v1(1355,3260) ; v1(1405,2910) 1405,2735 v1(1485,2655) ; v1(1550,2595) 1550,2455 v4(1560,2445) ; v2(1665,2335) 1735,2265 v1(1735,1830) ; v1(1750,1410) 1750,1705 1765,1720 v1(1765,1750) ; v1(2285,3370) 2400,3255 2455,3255 2459.7,3251.39 J4.1@2488.17,3222.93 2515,3194.47 2515,3190 2515,3165 2565,3115 v1(2565,2620) ; v1(2675,2355) 2635,2395 v1(2635,2545) 2635,2550 2770,2685 v2(2820,2685)
+3V3_SENS: C10.1 J6.2 J7.2 J8.2 J9.2 J10.1 Q7.3 R19.1 | length 2590.8
  Top Layer w10: R19.1@2415.82,2506.7 2433.12,2495 2435,2495 2490,2440 2490,2375 2505,2360 2535,2360 2595,2300 2600,2300 2601.61,2297.91 Q7.3@2616.29,2291.09 2630.98,2295 2635,2295 2725,2295 2755,2325 2895,2325 2896.51,2328.62 J10.1@2906.33,2352.16 2926.98,2337.19 2930,2335 2990,2275 3165,2275 3166.49,2270.64 J7.2@3174.76,2246.5 3200.24,2245.24 3205,2245 3425,2245 3427.08,2241 J6.2@3438.83,2218.35 ; C10.1@2783.12,2619.99 2805.88,2600 2810,2600 2810,2595 v2(2820,2585) ; v2(2800,2450) 2805,2450 v1(2835,2420)
  Bottom Layer w10: v2(2800,2450) 2820,2470 v2(2820,2585) ; v1(2835,2420) 2885,2370 2886.76,2368.53 J10.1@2906.33,2352.16 ; J9.2@3165.88,1809.33 3190.92,1814.21 3195,1815 3220,1840 3220,2200 3195,2225 3192.25,2227.92 J7.2@3174.76,2246.5 3183.39,2270.51 3185,2275 3230,2320 3230,2575 3325,2670 3328.08,2671.12 J8.2@3352.06,2679.82
+5V: BZ1.1 C4.1 D3.1 D4.1 D5.1 U3.1 U3.3 | length 3025.6
  Top Layer w20: U3.3@1563.8,2293.88 v1(1595,2262.7)
  Top Layer w24.5: 1485,2250 1489.02,2251.63 ; 1490,2250 1489.02,2251.63 ; 1489.02,2251.63 U3.1@1489.02,2293.88 1489.02,2251.63
  Top Layer w40: C4.1@811.17,2291.1 818.93,2297.67 820,2315 v1(840,2335) ; v1(990,2640) 1005,2655 1023.07,2670.4 D4.1@1042.44,2689.77 1061.81,2700 1080,2700 1205,2575 1315,2575 v1(1335,2555) ; v1(1225,1215) 1240,1200 1257.74,1183.87 D5.1@1277.11,1164.5 ; v1(1355,2105) 1370,2120 1388.26,2135.89 D3.1@1407.63,2155.26 1427,2174.63 1445,2190 1485,2230 1485,2245 1490,2250 ; v1(1460,2260) 1470,2250 1485,2250
  Bottom Layer w20: v1(1460,2260) 1460,2150 1595,2150 v1(1595,2262.7)
  Bottom Layer w40: v1(840,2335) 990,2485 v1(990,2640) ; v1(1225,1215) 1225,1425 1160,1490 1141.98,1497.36 BZ1.1@1127.69,1503.2 1137.56,1515.06 1150,1530 1150,1900 v1(1355,2105) ; v1(1335,2555) 1460,2430 v1(1460,2260)
+5V_REG: C3.1 D3.2 U2.3 | length 587.7
  Top Layer w40: U2.3@1286.69,2514.3 1297.06,2505.71 1310,2495 1455,2495 1473.75,2495 C3.1@1481.51,2488.66 1489.26,2482.08 1505,2465 1505,2450 v1(1510,2445) ; v1(1525,2195) 1530,2190 1545,2190 1561.49,2174.63 D3.2@1580.86,2155.26
  Bottom Layer w40: v1(1510,2445) 1525,2430 v1(1525,2195)
+12V: C1.1 C2.1 D1.1 D2.1 D10.1 D11.1 D12.1 D13.1 D14.1 J12.1 J13.1 J14.1 J15.1 J16.1 Q1.1 Q1.2 Q1.3 R3.1 R23.1 R26.1 R29.1 R32.1 R35.1 U2.1 | length 8759.7
  Top Layer w23.15: 830,1550 834.03,1549.74 ; 835,1550 834.03,1549.74 ; 880,1550 884.03,1549.74 ; 885,1435 884.03,1437.87 Q1.2@884.03,1493.8 ; 885,1550 884.03,1549.74 ; 930,1550 934.03,1549.74 Q1.3@934.03,1493.8 ; 834.03,1549.74 Q1.1@834.03,1493.8 834.03,1549.74 ; Q1.2@884.03,1493.8 884.03,1549.74 ; Q1.2@884.03,1493.8 884.03,1549.74
  Top Layer w33.07: 625,1705 628.2,1703.68 D2.1@628.2,1666.64 666.61,1666.64 670,1665
  Top Layer w40: 625,1705 625,1810 780,1965 795.96,1984.05 C1.1@864.55,1996.53 795.96,2005 780,2005 v1(760,2025) ; 670,1665 785,1550 830,1550 ; v1(750,2390) 735,2405 715.79,2420.85 D1.1@695.49,2444 715.79,2467.16 735,2485 765,2515 1055,2515 1073.23,2514.6 U2.1@1086.69,2514.3 1092.26,2502.04 1100,2485 1240,2345 1590,2345 1625,2310 1643.14,2290.77 R3.1@1645.44,2283.67 1647.73,2276.56 1660,2260 v1(1660,2240) ; 835,1550 880,1550 ; 885,1435 905,1415 899.07,1396.98 C2.1@891.32,1390.4 ; 885,1550 930,1550 ; J12.1@1371.36,682.24 1388.6,673.41 1405,665 1465,605 1830,605 1835.96,587.48 J13.1@1842.19,569.15 1858.54,579.54 1875,590 1920,635 2265,635 2280,620 2288.93,602.34 J14.1@2297.67,585.05 2314.15,595.22 2330,605 2525,800 2740,800 2749.68,817.37 J15.1@2759.1,834.3 ; v1(1660,1725) 1660,1705 1677.19,1688.98 D10.1@1696.56,1669.61 1710,1650.24 1710,1635 v1(1710,1615) ; v1(1710,1315) 1710,1265 1755,1220 1765,1220 1782.93,1201.22 R23.1@1785.22,1194.12 1787.52,1187.01 1800,1170 1860,1110 2015,1110 2030.85,1091.77 R29.1@2033.15,1084.66 2035.44,1091.77 2050,1110 v1(2065,1125) ; v1(2170,1375) 2150,1395 2151.75,1411.59 D11.1@2171.12,1430.96 2185,1450.33 2185,1470 2185,1535 2185,1551.94 D12.1@2200.09,1571.31 2219.46,1590.68 2235,1610 2415,1790 2415,1805.29 D14.1@2407.34,1824.66 2395,1844.03 2395,1860 2395,1925 2400,1930 2416.94,1945.64 D13.1@2436.31,1965.01 2416.94,1984.38 2400,1995 2285,1995 2255,2025 2238.64,2044.65 R32.1@2236.35,2051.76 2238.64,2058.86 2255,2075 2255,2080 2355,2180 2371.05,2186.34 R35.1@2373.34,2193.44 ; v1(2305,1240) 2340,1240 2385,1195 2402.21,1179.46 R26.1@2404.51,1172.36 2406.8,1165.25 2415,1150 2705,860 2730,860 2744.58,847.12 J15.1@2759.1,834.3 ; J16.1@3053.58,1216.11 3064.56,1200.16 3075,1185 3075,1170 2775,870 2766.98,851.99 J15.1@2759.1,834.3
  Bottom Layer w40: v1(750,2390) 770,2370 770,2035 v1(760,2025) ; v1(1660,1725) v1(1660,2240) ; v1(1710,1315) v1(1710,1615) ; v1(2065,1125) 2065,1270 v1(2170,1375) v1(2305,1240)
BOOT: R6.2 SW2.1 SW2.2 U1.27 | length 2076.5
  Top Layer w10: R6.2@1115.15,3215.75 1132.45,3193.64 1135,3190 1180,3190 v1(1210,3160) ; v1(1320,3175) v1(1620,3175) ; v1(1880,2930) 2215,2930 2345,2800 2347.37,2799.76 U1.27@2371.9,2787.05 2396.42,2799.76 2400,2800 2415,2815 2415,3070 2440,3095 2444.47,3099.63 SW2.1@2459.15,3109.39 2473.84,3115 2475,3115 2680,3115 2680.69,3115 SW2.2@2695.37,3109.39
  Bottom Layer w10: v1(1210,3160) 1240,3130 1275,3130 v1(1320,3175) ; v1(1620,3175) 1635,3175 v1(1880,2930)
BTN_MODE: C15.1 J11.1 R20.2 U1.6 | length 2549.5
  Top Layer w10: U1.6@1671.13,3187.05 1695.65,3174.33 1700,3170 1710,3170 1855,3025 v1(2110,3025) ; v1(2415,2720) 2490,2645 2575,2645 2595,2625 2625,2625 2645,2605 2660,2605 2661.29,2604.28 R20.2@2678.59,2582.18 2695.88,2580 2700,2580 2795,2580 2815,2560 2970,2560 2980,2550 2984.3,2549.88 C15.1@3007.05,2528.3 3020,2506.73 3020,2505 3020,2440 3160,2300 3190,2300 v1(3220,2270)
  Bottom Layer w10: v1(2110,3025) v1(2415,2720) ; v1(3220,2270) 3245,2245 3245,2030 3455,1820 3456.68,1815.88 J11.1@3467.45,1789.53
BUZ_CTRL: R10.1 U1.7 | length 2240.9
  Top Layer w10: R10.1@1478.58,1028.33 1495.87,1050.44 1500,1055 v1(1510,1065) ; v4(1630,3145) 1640,3145 1645,3150 1646.6,3149.76 U1.7@1671.13,3137.05
  Bottom Layer w10: v1(1510,1065) 1510,1240 1625,1355 1625,2325 1650,2350 1650,3125 v4(1630,3145)
BUZ_G: Q8.1 R10.2 R11.1 | length 373.7
  Top Layer w10: Q8.1@1358.7,981.49 1373.38,985 1375,985 1520,985 1540,1005 1540.03,1006.23 R10.2@1557.32,1028.33 1540.03,1050.44 1540,1055 v1(1540,1070) ; v1(1540,1120) 1540,1130 1550,1140 1550.71,1144.55 R11.1@1568,1166.65
  Bottom Layer w10: v1(1540,1070) v1(1540,1120)
BUZ_N: BZ1.2 D5.2 Q8.3 | length 572.6
  Top Layer w10: Q8.3@1279.96,1018.89 1294.64,1026.69 1295,1030 1310,1030 v1(1315,1035) ; v1(1375,1095) 1415,1135 1415.97,1135 D5.2@1450.34,1164.5 1435,1198.87 1435,1200 v1(1435,1220)
  Bottom Layer w10: v1(1315,1035) v1(1375,1095) ; BZ1.2@1426.9,1503.2 1434.11,1473.63 1435,1470 v1(1435,1220)
CC1: J3.A5 R7.1 | length 732.9
  Top Layer w10: v1(565,2695) 590,2720 595,2720 597.31,2718.49 J3.A5@617.9,2717.59 ; v1(940,2985) 1040,3085 1037.36,3088.74 R7.1@1020.06,3110.84
  Bottom Layer w10: v1(565,2695) 650,2695 v1(940,2985)